# Altium PCB PCB1.PcbDoc (part 1 of 2)
Units mm, origin at the board's own origin, x right, y up, seen from the top; angles counter-clockwise.
Board outline 60 x 60 mm, 2 copper layers (Top Layer, Bottom Layer); 59 components, 49 nets, 265 pads, 0 vias.
Unrouted connection lines stored in the file: 170.
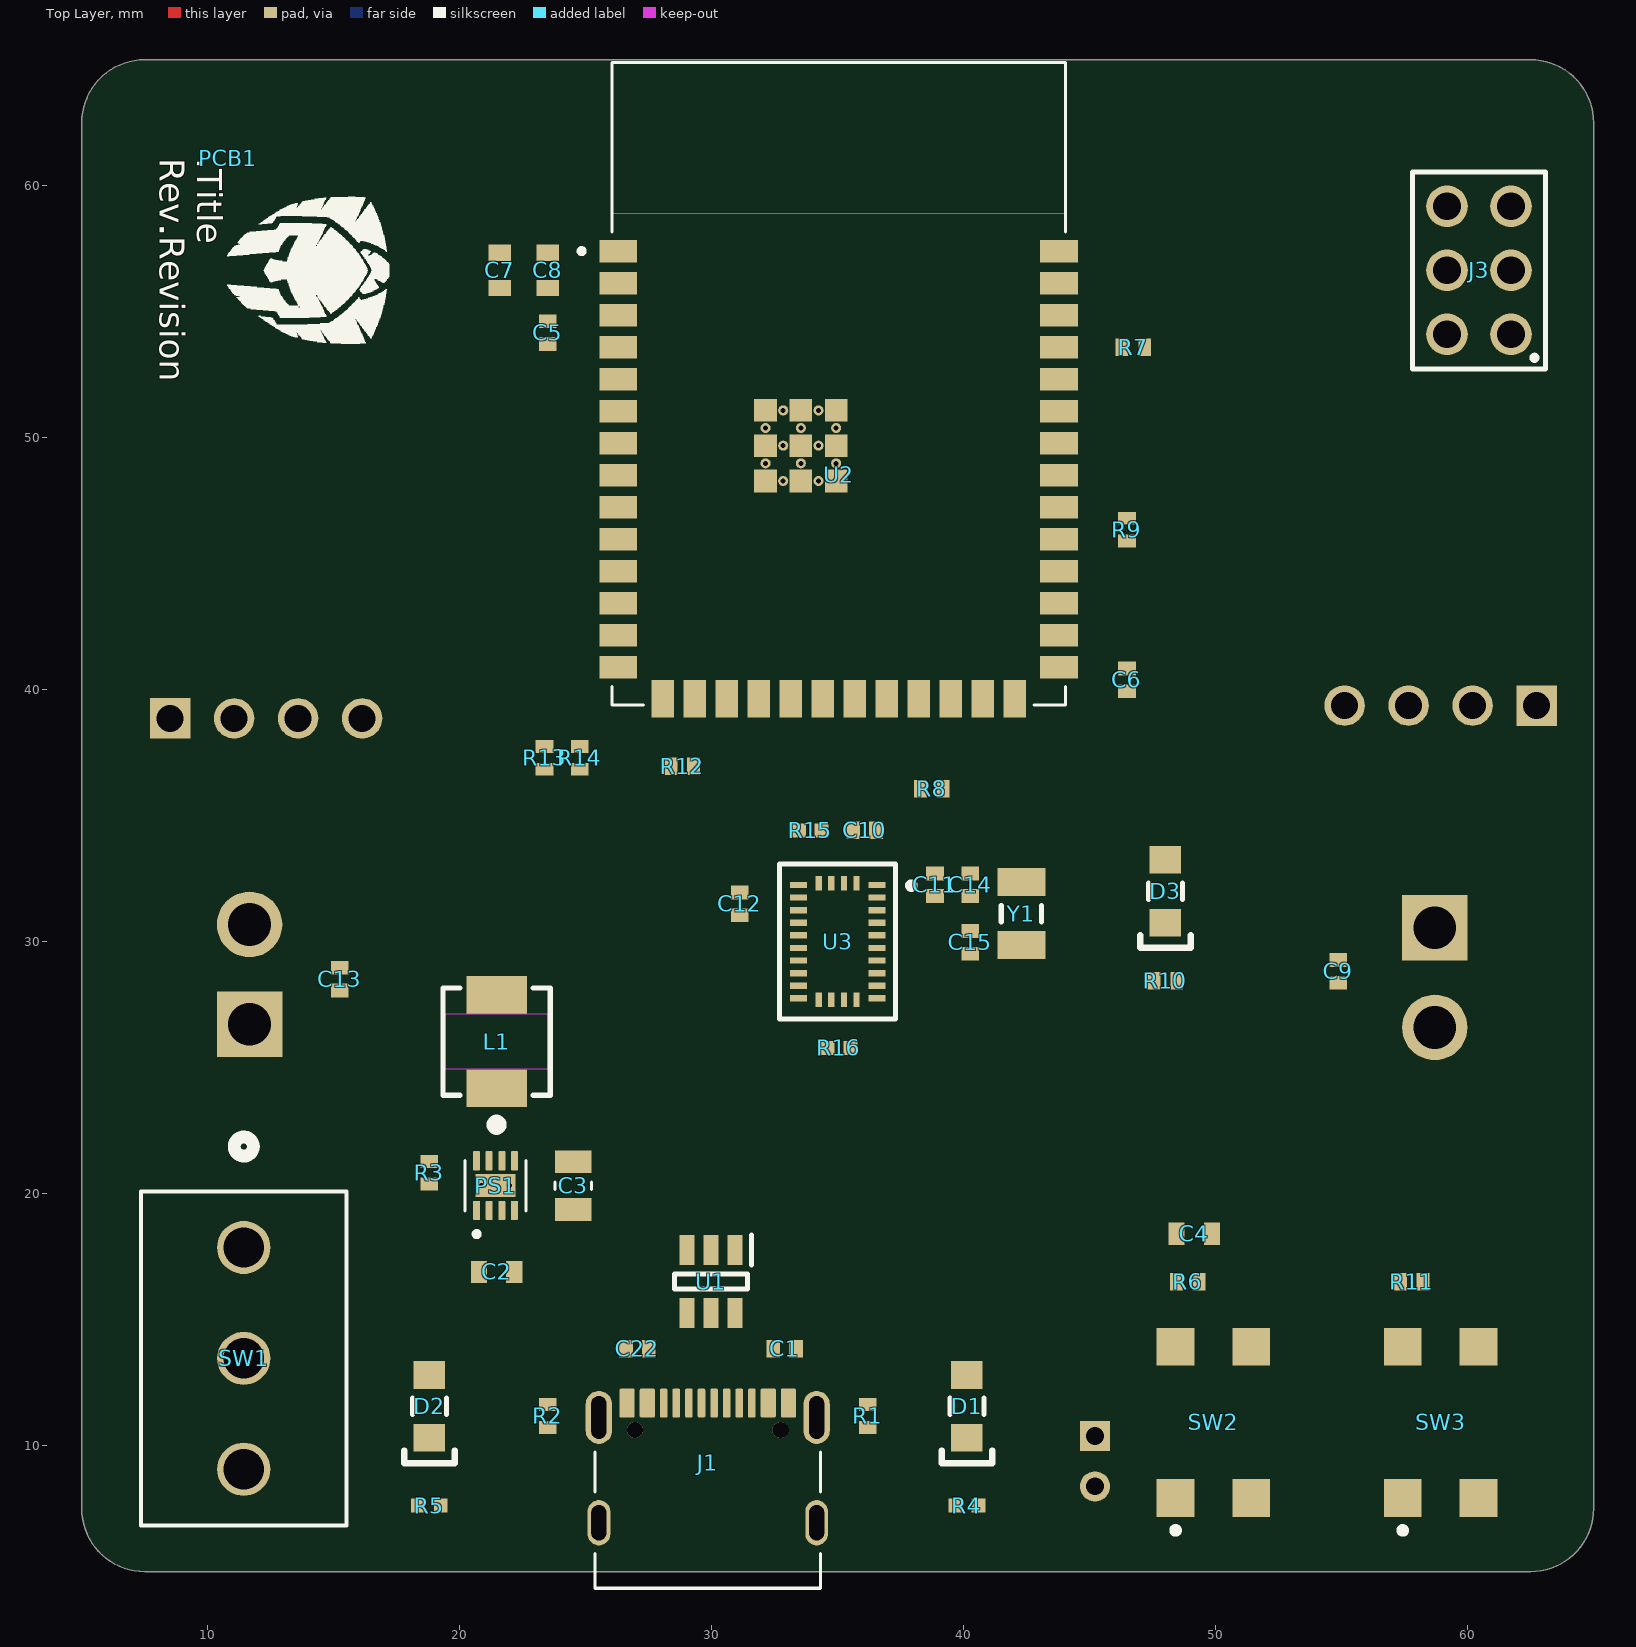
[diagram p0: Top Layer view]
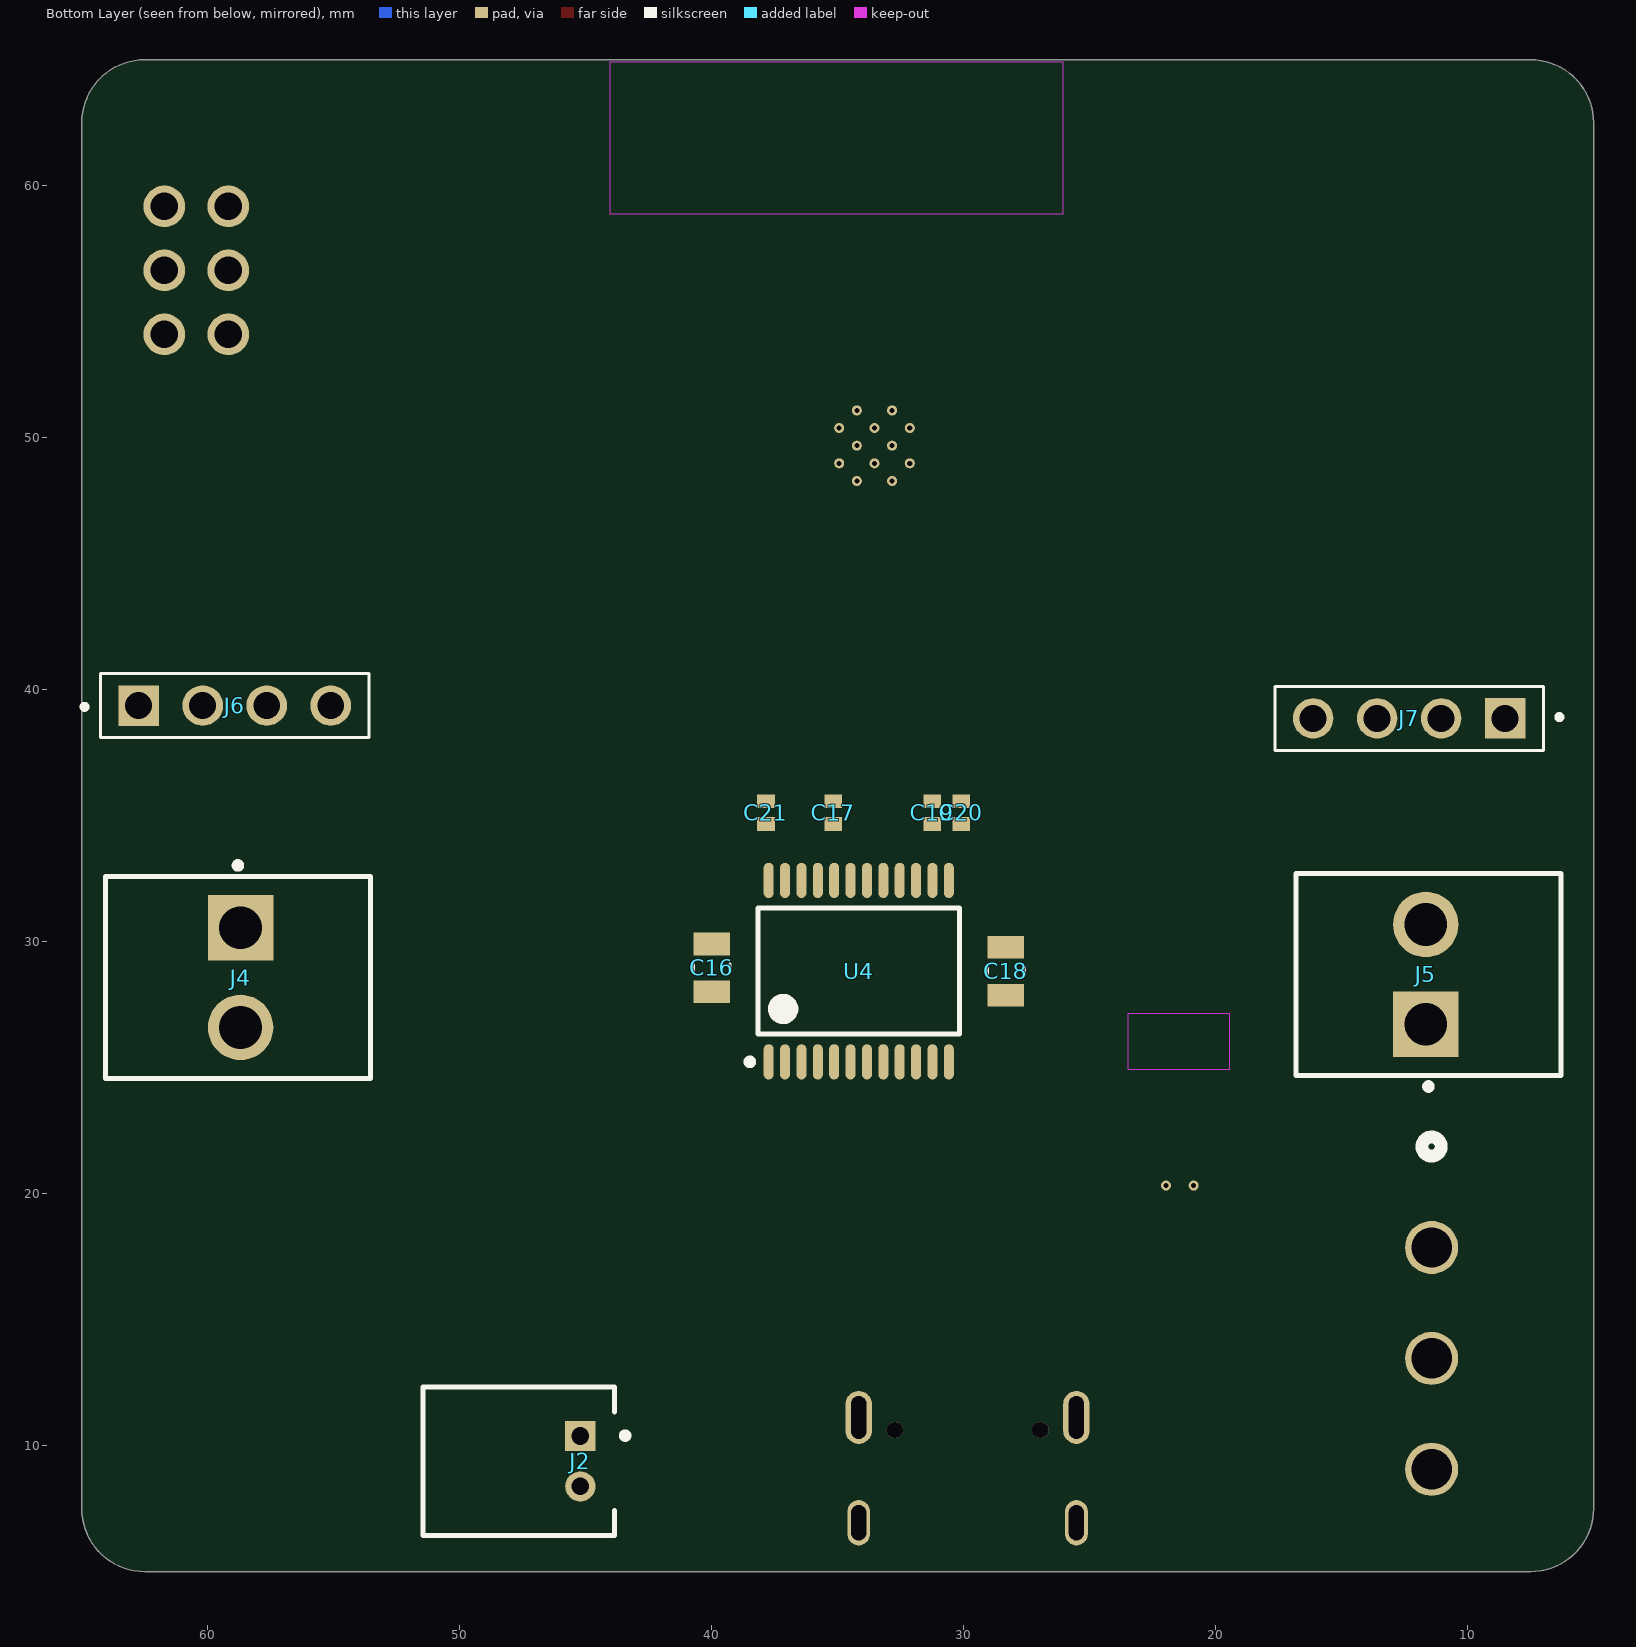
[diagram p1: Bottom Layer view, seen from below]

## Layer stack, top to bottom
Top Solder: solder mask 0.0102, Solder Resist, Dk 3.5
Top Layer: signal copper 0.0356
Dielectric 1: dielectric 0.32, FR-4, Dk 4.8
Bottom Layer: signal copper 0.0356
Bottom Solder: solder mask 0.0102, Solder Resist, Dk 3.5

## Board outline
5,7.5 5,62.5 cw(c7.5,62.5) 7.5,65 62.5,65 cw(c62.5,62.5) 65,62.5 65,7.5 cw(c62.5,7.5) 62.5,5 7.5,5 cw(c7.5,7.5)

## Design rules (kind name [scope] priority, off if disabled: settings)
Clearance [All] p1: gap=0.254 ignorepadtopadclearanceinfootprint=FALSE
DiffPairsRouting [All] p1: maxlimit=0.254 minlimit=0.254 mostfreqgap=0.254 toplayer_minwidth=0.381 toplayer_maxwidth=0.381 toplayer_prefwidth=0.381 bottomlayer_minwidth=0.381 bottomlayer_maxwidth=0.381 bottomlayer_prefwidth=0.381 maxuncoupledlength=12.7
PolygonConnect [All] p1: connectstyle=Relief reliefconductorwidth=0.254 reliefentries=4 polygonreliefangle="90 Angle" airgapwidth=0.254
RoutingVias [All] p1: holewidth=0.711 width=1.27 viastyle="Through Hole" minholewidth=0.711 minwidth=1.27 maxholewidth=0.711 maxwidth=1.27
SolderMaskExpansion [All] p1: expansion=0 istentingtop=FALSE
SupplyNets "Schematic Supply Nets_4" [InNet('VBUS')] p1: voltage=0.000
SupplyNets "Schematic Supply Nets_3" [InNet('VSEL')] p2: voltage=0.000
SupplyNets "Schematic Supply Nets_2" [InNet('+3V3')] p3: voltage=0.000
SupplyNets "Schematic Supply Nets_1" [InNet('VBAT')] p4: voltage=0.000
SupplyNets "Schematic Supply Nets" [InNet('GND')] p5: voltage=0.000
Width [All] p1: maxlimit=0.254 minlimit=0.254 preferedwidth=0.254
29 further rules are at their usual default settings.

## Classes and differential pairs
net class POWER_NET: +3V3 VBAT VBUS VSEL
component class "Power & USB": C1 C2 C3 C22 D1 D2 J1 J2 L1 PS1 R1 R2 R3 R4 R5 SW1 U1
component class Peripherials: C9 C10 C11 C12 C13 C14 C15 C16 C17 C18 C19 C20 C21 J4 J5 J6 J7 R15 R16 U3 U4 Y1
component class "Logic Control": C4 C5 C6 C7 C8 D3 J3 R6 R7 R8 R9 R10 R11 R12 R13 R14 SW2 SW3 U2
component class cover: PCB1
differential pair USB_MCU: +USB_MCU_P -USB_MCU_N
differential pair usb_io: +usb_io_P -usb_io_N
differential pair USB_C: +USB_C_P -USB_C_N

## Components (designator, comment, footprint, x,y, rotation, side; value= is the part's Value field where it differs from the comment)
C1 "CGA2B3X7R1H104K050BB" C0402_H0P7 32.893,13.843 r0 top value=100nF
C2 "GRM188R61E106MA73D" C0603_H0P8 21.463,16.891 r0 top value=10uF
C3 "GRM21BR61E226ME44K" C0805_H1P45 24.511,20.32 r270 top value=22uF
C4 "CL10B105KO8NNNC" C0603_H0P8 49.149,18.415 r0 top value=1uF
C5 "GRM155R71E104KE14J" C0402_H0P7 23.495,54.171 r270 top value=100nF
C6 "GRM155R71E104KE14J" C0402_H0P7 46.482,40.386 r270 top value=100nF
C7 "CL10B105KO8NNNC" C0603_H0P8 21.59,56.642 r90 top value=1uF
C8 "GRM188R61E106MA73D" C0603_H0P8 23.495,56.642 r90 top value=10uF
C9 "CGA2B3X7R1H104K050BB" C0402_H0P7 54.864,28.82 r270 top value=100nF
C10 "GRM155R71C104JA88D" C0402_H0P7 36.068,34.417 r0 top value=100nF
C11 "GRM155R71C104JA88D" C0402_H0P7 38.862,32.258 r90 top value=100nF
C12 "GRM155R71C104JA88D" C0402_H0P7 31.115,31.496 r90 top value=100nF
C13 "CGA2B3X7R1H104K050BB" C0402_H0P7 15.24,28.517 r90 top value=100nF
C14 "CC0402JRNPO9BN220" C0402_H0P7 40.259,32.258 r90 top value=22pF
C15 "CC0402JRNPO9BN220" C0402_H0P7 40.259,29.972 r270 top value=22pF
C16 "GRM21BR61E106KA73K" C0805_H1P45 40.005,28.956 r270 bottom value=10uF
C17 "GRM155R71E104KE14J" C0402_H0P7 35.179,35.121 r90 bottom value=100nF
C18 "GRM21BR61E106KA73K" C0805_H1P45 28.321,28.829 r270 bottom value=10uF
C19 "GRM155R71E104KE14J" C0402_H0P7 31.242,35.121 r90 bottom value=100nF
C20 "GRM155R71E104KE14J" C0402_H0P7 30.099,35.121 r90 bottom value=100nF
C21 "GRM155R71E104KE14J" C0402_H0P7 37.846,35.121 r90 bottom value=100nF
C22 "CGA2B3X7R1H104K050BB" C0402_H0P7 27.051,13.843 r180 top value=100nF
D1 "LTST-C171KRKT" LTST-C171KXKT 40.132,11.557 r90 top
D2 "LTST-C171KGKT" LTST-C171KGKT 18.796,11.557 r90 top
D3 "LTST-C171KBKT" LTST-C171KXKT 48.006,32.004 r90 top
J1 "12402012E212A" AMPHENOL_12402012E212A 29.845,6.939 r0 top
J2 "S2B-PH-K-S" JST-S2B-PH-K-S_V 47.662,9.382 r270 bottom value=10µF
J3 "61300621121" 61300621121 60.452,56.642 r90 top
J4 "26-60-4020" FP-26-60-4020-MFG 58.801,28.575 r270 bottom
J5 "26-60-4020" FP-26-60-4020-MFG 11.557,28.702 r90 bottom
J6 "PPTC041LFBN-RC" SULLINS_PPTC041LFBN-RC 58.928,39.37 r180 bottom
J7 "PPTC041LFBN-RC" SULLINS_PPTC041LFBN-RC 12.319,38.862 r0 bottom
L1 "I2u2H" WE-LHMI_4020 21.463,26.035 r90 top
PCB1 "'" PCB_Logo 10.795,61.087 r270 top
PS1 "TPS62162DSGR" SON50P200X200X80-9N 21.421,20.32 r90 top
R1 "5K1" R0402_H0P4 36.195,11.176 r270 top
R2 "5K1" R0402_H0P4 23.495,11.176 r270 top
R3 "RC0402FR-07100KL" R0402_H0P4 18.796,20.828 r90 top value=100K
R4 "RC0402FR-0710KL" RES0402-M 40.132,7.62 r0 top value=10K
R5 "RC0402FR-0710KL" RES0402-M 18.796,7.62 r0 top value=10K
R6 "RC0402FR-0710KL" R0402_H0P4 48.895,16.51 r0 top value=10K
R7 "470R" R0402_H0P4 46.736,53.594 r180 top
R8 "RC0402FR-072K2P" R0402_H0P4 38.735,36.068 r0 top value=2K2
R9 "RC0402FR-072K2P" R0402_H0P4 46.482,46.355 r90 top value=2K2
R10 "RC0402FR-0710KL" R0402_H0P4 48.006,28.448 r0 top value=10K
R11 "RC0402FR-7D47KL" R0402_H0P4 57.785,16.51 r0 top value=47K
R12 "RC0402FR-7D47KL" R0402_H0P4 28.829,36.957 r180 top value=47K
R13 "RC0402JR-0733RL" R0402_H0P4 23.368,37.292 r90 top value=33R
R14 "RC0402JR-0733RL" R0402_H0P4 24.765,37.292 r90 top value=33R
R15 "RC0402FR-0710KL" RES0402-M 33.909,34.417 r0 top value=10K
R16 "RC0402FR-0710KL" RES0402-M 35.052,25.781 r0 top value=10K
SW1 "8SS1012-Z" 8SS1012-Z_NDC 11.43,17.862 r270 top
SW2 "TS110916045" TS110916045 49.911,10.922 r90 top
SW3 "TS110916045" TS110916045 58.928,10.922 r90 top
U1 "USBLC6-2SC6" SOT95P280X145-6N 29.972,16.51 r270 top
U2 "ESP32-S3-WROOM-1-N4" XCVR_ESP32-S3-WROOM-1-N4 35.039,52.144 r0 top
U3 "BNO085" FP-BNO085-MFG 35,30 r0 top
U4 "TB6612FNG" TOSH-SSOP-24_N 34.163,28.829 r90 bottom
Y1 "ABS07-32.768KHZ-T" FP-ABS07-MFG 42.291,31.115 r270 top value=12.5pF

## Footprints (in the part's own frame and the unit in brackets; to place one, negate y for a bottom-side part, rotate by r counter-clockwise, add the part's x,y. Pads: shape width x height; smd on the part's side, far side on the other; paste and mask are expansions set on the pad)
8SS1012-Z_NDC [mil]
  round 83 / inner round 60 / far side round 83 hole 63 paste-99999 mask+0: 1(0,0) 2(173.23,0) 3(346.46,0)
  silkscreen extent -173,-161 434,161, body extent -83,-156 429,156, height 610
61300621121 [mm]
  round 1.65 hole 1.1: 1(-2.54,-1.27) 2(-2.54,1.27) 3(0,-1.27) 4(0,1.27) 5(2.54,-1.27) 6(2.54,1.27)
  silkscreen extent -3.91,-2.64 3.91,2.64, body extent -3.81,-2.54 3.81,2.54, height 8.57
AMPHENOL_12402012E212A [mm]
  rrect16% 0.6x1.14 smd mask+0.05: A1_B12(-3.2,4.75) A4_B9(-2.4,4.75) B1_A12(3.2,4.75) B4_A9(2.4,4.75)
  rrect33% 0.3x1.14 smd mask+0.05: A5(-1.25,4.75) A6(-0.25,4.75) A7(0.25,4.75) A8(1.25,4.75) B5(1.75,4.75) B6(0.75,4.75) B7(-0.75,4.75) B8(-1.75,4.75)
  oval 1.05x2.1 hole 0.6 slot 1.7 at 90 deg: SH1(-4.32,4.18) SH2(4.32,4.18)
  oval 0.9x1.8 hole 0.6 slot 1.4 at 90 deg: SH3(-4.32,0) SH4(4.32,0)
  round 0.65 hole 0.65 unplated mask+0: ""(-2.89,3.68) ""(2.89,3.68)
  silkscreen extent -4.47,-2.6 4.47,2.81, body extent -4.47,-2.59 4.47,5.01, height 3.27
C0402_H0P7 [mm]
  rect 0.55x0.7 smd mask+0.05: 1(-0.45,0) 2(0.45,0)
  body extent -0.53,-0.28 0.53,0.28, height 0.55
C0603_H0P8 [mm]
  rect 0.64x0.89 smd mask+0.05: 1(-0.7,0) 2(0.7,0)
  body extent -0.9,-0.5 0.9,0.5, height 1
C0805_H1P45 [mm]
  rect 0.9x1.45 smd mask+0.05: 1(-0.95,0) 2(0.95,0)
  silkscreen extent -0.15,-0.72 0.15,0.72, body extent -1.1,-0.72 1.1,0.72, height 1.45
FP-26-60-4020-MFG [mm]
  rect 2.6x2.6 hole 1.7 paste-2539.97 mask+0: 1(-1.98,0.105)
  round 2.6 hole 1.7 paste-2539.97 mask+0: 2(1.98,0.105)
  silkscreen extent -4.57,-5.26 4.01,5.26, body extent -3.89,-4.81 3.89,5.2, height 15.37
FP-ABS07-MFG [mm]
  rect 1.1x1.9 smd paste+0 mask+0: 1(-1.25,0) 2(1.25,0)
  silkscreen extent -0.33,-0.8 0.33,0.8, body extent -1.9,-1.05 1.9,1.05, height 0.25
FP-BNO085-MFG [mm]
  rect 0.675x0.25 smd paste+0 mask+0: 1(1.562,2.25) 6(-1.562,2.25) 7(-1.562,1.75) 8(-1.562,1.25) 9(-1.562,0.75) 10(-1.562,0.25) 11(-1.562,-0.25) 12(-1.562,-0.75) 13(-1.562,-1.25) 14(-1.562,-1.75) 15(-1.562,-2.25) 20(1.562,-2.25) 21(1.562,-1.75) 22(1.562,-1.25) 23(1.562,-0.75) 24(1.562,-0.25) 25(1.562,0.25) 26(1.562,0.75) 27(1.562,1.25) 28(1.562,1.75)
  rect 0.25x0.575 smd paste+0 mask+0: 2(0.75,2.312) 3(0.25,2.312) 4(-0.25,2.312) 5(-0.75,2.312) 16(-0.75,-2.312) 17(-0.25,-2.312) 18(0.25,-2.312) 19(0.75,-2.312)
  silkscreen extent -2.3,-3.08 3.05,3.08, body extent -2.45,-3.15 2.45,3.15, height 0.25
JST-S2B-PH-K-S_V [mm] "THD, 2-Leads, Body 7.6x5.9mm, Pitch 2mm"
  rect 1.2x1.2 hole 0.7: 1(-1,2.45)
  round 1.2 hole 0.7: 2(1,2.45)
  silkscreen extent -2.95,-3.8 2.95,4.35, body extent -2.95,-3.8 2.95,3.8, height 4.8
LTST-C171KGKT [mm]
  rect 1.1x1.25 smd paste+0 mask+0.05: 1(-1.25,0) 2(1.25,0)
  silkscreen extent -2.25,-1 0.33,1, body extent -1.9,-0.77 1.9,0.77, height 0.25
LTST-C171KXKT [mm]
  rect 1.1x1.25 smd paste+0 mask+0.05: 1(-1.25,0) 2(1.25,0)
  silkscreen extent -2.25,-1 0.33,1, body extent -1,-0.63 1,0.63, height 0.8
PCB_Logo [mm] "Logo"
  silkscreen extent 1.52,-0.03 7.36,6.41
R0402_H0P4 [mm]
  rect 0.51x0.7 smd mask+0.05: 1(-0.45,0) 2(0.45,0)
  body extent -0.52,-0.3 0.52,0.3, height 0.34
RES0402-M [mm] "Chip Resistor, 2-Leads, Body 1.00x0.50mm, IPC Medium Density"
  rect 0.55x0.55 smd mask+0.051: 1(-0.45,0) 2(0.45,0)
  body extent -0.53,-0.28 0.53,0.28, height 0.35
SON50P200X200X80-9N [mm]
  rrect25% 0.76x0.28 smd: 1(-0.985,0.75) 2(-0.985,0.25) 3(-0.985,-0.25) 4(-0.985,-0.75) 5(0.985,-0.75) 6(0.985,-0.25) 7(0.985,0.25) 8(0.985,0.75)
  rect 0.9x1.6 smd paste-2: 9(0,0)
  round 0.4 hole 0.2 mask+0: 10(0,0.55) 11(0,-0.55)
  silkscreen extent -2.02,-1.21 1,1.21, body extent -1,-1 1,1, height 0.75
SOT95P280X145-6N [mm]
  rect 1.2x0.6 smd: 1(-1.25,0.95) 2(-1.25,0) 3(-1.25,-0.95) 4(1.25,-0.95) 5(1.25,0) 6(1.25,0.95)
  silkscreen extent -1.85,-1.45 0.3,1.6, body extent -1.4,-1.45 1.4,1.45, height 1.2
SULLINS_PPTC041LFBN-RC [mm]
  rect 1.605x1.605 / inner round 1.605 / far side rect 1.605x1.605 hole 1.07: 1(-3.81,0)
  round 1.605 hole 1.07: 2(-1.27,0) 3(1.27,0) 4(3.81,0)
  silkscreen extent -6.06,-1.27 5.33,1.27, body extent -5.33,-1.27 5.33,1.27, height 8.51
TOSH-SSOP-24_N [mm] "SOP, 24-Leads, Body 8x5.8mm, Pitch 0.65mm, IPC Medium Density"
  oval 1.4x0.4 smd: 1(-3.6,3.575) 2(-3.6,2.925) 3(-3.6,2.275) 4(-3.6,1.625) 5(-3.6,0.975) 6(-3.6,0.325) 7(-3.6,-0.325) 8(-3.6,-0.975) 9(-3.6,-1.625) 10(-3.6,-2.275) 11(-3.6,-2.925) 12(-3.6,-3.575) 13(3.6,-3.575) 14(3.6,-2.925) 15(3.6,-2.275) 16(3.6,-1.625) 17(3.6,-0.975) 18(3.6,-0.325) 19(3.6,0.325) 20(3.6,0.975) 21(3.6,1.625) 22(3.6,2.275) 23(3.6,2.925) 24(3.6,3.575)
  silkscreen extent -3.72,-4 2.5,4.45, body extent -3.8,-4 3.8,4, height 1.6
TS110916045 [mm]
  rect 1.5x1.5 smd: 1(-3,1.5) 2(3,1.5) 3(-3,-1.5) 4(3,-1.5)
  silkscreen extent -4.39,1.4 -4.19,1.6, body extent -3.28,-2.24 3.22,2.26, height 3.8
WE-LHMI_4020 [mm]
  rect 1.5x2.4 smd: 1(-1.85,0) 2(1.85,0)
  Keep-Out Layer region: 1.1,-2.03 -1.1,-2.03 -1.1,2.03 1.1,2.03
  silkscreen extent -3.5,-2.13 2.13,2.13, body extent -2.22,-2.03 2.22,2.03, height 1.8
XCVR_ESP32-S3-WROOM-1-N4 [mm]
  rect 1.5x0.9 smd: 1(-8.75,5.26) 2(-8.75,3.99) 3(-8.75,2.72) 4(-8.75,1.45) 5(-8.75,0.18) 6(-8.75,-1.09) 7(-8.75,-2.36) 8(-8.75,-3.63) 9(-8.75,-4.9) 10(-8.75,-6.17) 11(-8.75,-7.44) 12(-8.75,-8.71) 13(-8.75,-9.98) 14(-8.75,-11.25) 27(8.75,-11.25) 28(8.75,-9.98) 29(8.75,-8.71) 30(8.75,-7.44) 31(8.75,-6.17) 32(8.75,-4.9) 33(8.75,-3.63) 34(8.75,-2.36) 35(8.75,-1.09) 36(8.75,0.18) 37(8.75,1.45) 38(8.75,2.72) 39(8.75,3.99) 40(8.75,5.26)
  rect 0.9x1.5 smd: 15(-6.985,-12.5) 16(-5.715,-12.5) 17(-4.445,-12.5) 18(-3.175,-12.5) 19(-1.905,-12.5) 20(-0.635,-12.5) 21(0.635,-12.5) 22(1.905,-12.5) 23(3.175,-12.5) 24(4.445,-12.5) 25(5.715,-12.5) 26(6.985,-12.5)
  rect 0.9x0.9 smd: 41_1(-1.5,-2.46) 41_2(-2.9,-2.46) 41_3(-0.1,-2.46) 41_4(-2.9,-3.86) 41_5(-1.5,-3.86) 41_6(-0.1,-3.86) 41_7(-2.9,-1.06) 41_8(-1.5,-1.06) 41_9(-0.1,-1.06)
  round 0.4 hole 0.2 mask+0: 41_10(-1.5,-1.76) 41_11(-2.9,-1.76) 41_12(-0.1,-1.76) 41_13(-2.9,-3.16) 41_14(-1.5,-3.16) 41_15(-0.1,-3.16) 41_16(-2.2,-1.06) 41_17(-0.8,-1.06) 41_18(-2.2,-2.46) 41_19(-0.8,-2.46) 41_20(-2.2,-3.86) 41_21(-0.8,-3.86)
  Keep-Out Layer region: 9,6.75 -9,6.75 -9,12.75 9,12.75
  Keep-Out Layer region: 9,6.75 -9,6.75 -9,12.75 9,12.75
  silkscreen extent -10.3,-12.75 9,12.75, body extent -8.98,-12.7 9.02,12.8, height 3.25

## Part data
C1 C9 C13 C22: library part "C0.1uF 50V 0402", "C0.1uF 50V X7R 10% 0402", Capacitor Type=Ceramic, Case/Package=0402, Manufacturer=TDK, Max Operating Temperature=125°C, Min Operating Temperature=-55°C, Package Shape=Rectangular, Package Style=SMTMeter, Rated DC Voltage (URdc)=50V, Supplier Part Number=445-6899-1-ND, Temperature Characteristics Code=X7R, Tolerance  (fill in as +-)=10%, Category="Ceramic Capacitors", ComponentLink1Description=https://datasheet.ciiva.com:443/pdfs/VipMasterIC/IC/TDKC/TDKC-S-A0008953915/TDKC-S-A0008953915-1.pdf?src-supplier=IHS+Markit, ComponentLink1URL=https://datasheet.ciiva.com:443/pdfs/VipMasterIC/IC/TDKC/TDKC-S-A0008953915/TDKC-S-A0008953915-1.pdf?src-supplier=IHS+Markit, ComponentLink2Description=https://datasheet.ciiva.com/16498/mlccspec-automotive-general-midvoltage-en-16498528.pdf?src-supplier=Future+Electronics, ComponentLink2URL=https://datasheet.ciiva.com/16498/mlccspec-automotive-general-midvoltage-en-16498528.pdf?src-supplier=Future+Electronics, ComponentLink3Description=https://datasheet.ciiva.com/24216/cga2b3x7r1h104k050bb-266281-24216070.pdf?src-supplier=Mouser, ComponentLink3URL=https://datasheet.ciiva.com/24216/cga2b3x7r1h104k050bb-266281-24216070.pdf?src-supplier=Mouser, ComponentLink4Description=https://datasheet.ciiva.com/22725/1735392-22725627.pdf?src-supplier=Element14, ComponentLink4URL=https://datasheet.ciiva.com/22725/1735392-22725627.pdf?src-supplier=Element14, Dielectric Material=Ceramic, Height=0.5mm, JESD-609 Code=e3, Length=1mm, Manufacturer Part Number=CGA2B3X7R1H104K050BB, Mounting Technology="Surface Mount", Multilayer=Yes, Packaging="Tape and Reel", Pins=2, Pricing="1=0.13, 10=0.075, 100=0.0451, 1000=0.02937, 2500=0.02541, 5000=0.02301 (USD)", Reach SVHC Compliant=Yes, Reference Standard=AEC-Q200, RoHS=Yes, RoHS Compliant=Yes, Stock=2155708, Supplier=Digikey, Supplier 1=DigiKey, Supplier Part Number 1=445-6899-1-ND, Terminal Finish=Nickel, Termination=Wraparound, Tolerance (fill in as +-)=10%, Width=0.5mm
C2 C8: library part "C10uF 25V 0603", "10uF 25V X5R 20% 0603", Manufacturer="Murata Electronics North America", Package=0603, Supplier Part Number 1=490-7202-1-ND, Temp Coef=X5R, Tolerance=20%, Voltage=25V, Datasheet=https://www.murata.com/~/media/webrenewal/support/library/catalog/products/capacitor/mlcc/c02e.ashx?la=en-us, Internal Code=0-ECCAP10uX5RV25%20P0603-, Manufacturer Part Number=GRM188R61E106MA73D, Packaging="Cut Tape", RoHS Compliant=Yes, Supplier 1=DigiKey, Supplier Link 1=https://www.digikey.com/products/en?keywords=490-7202-1-ND, Type=Capacitor
C3: library part "C22uF 25V 0805", "22uF 25V X5R 20% 0805", Capacitor Type=Ceramic, Case/Package=0805, Manufacturer=Murata, Max Operating Temperature=85°C, Min Operating Temperature=-55°C, Package Shape=Rectangular, Package Style=SMTMeter, Rated DC Voltage (URdc)=25V, Supplier Part Number=81-GRM21BR61E226ME4K, Temperature Characteristics Code=X5R, Tolerance  (fill in as +-)=20%, Category="Ceramic Capacitors", ComponentLink1Description=https://datasheet.ciiva.com:443/pdfs/VipMasterIC/IC/MURE/MURE-S-A0002977178/MURE-S-A0002978778-1.pdf?src-supplier=IHS+Markit, ComponentLink1URL=https://datasheet.ciiva.com:443/pdfs/VipMasterIC/IC/MURE/MURE-S-A0002977178/MURE-S-A0002978778-1.pdf?src-supplier=IHS+Markit, ComponentLink2Description=http://www.mouser.com/ds/2/281/c02e-2905.pdf?src-supplier=Mouser, ComponentLink2URL=http://www.mouser.com/ds/2/281/c02e-2905.pdf?src-supplier=Mouser, ComponentLink3Description=https://datasheet.octopart.com/GRM21BR61E226ME44K-Murata-datasheet-155345081.pdf?src-supplier=Element14, ComponentLink3URL=https://datasheet.octopart.com/GRM21BR61E226ME44K-Murata-datasheet-155345081.pdf?src-supplier=Element14, ComponentLink4Description=http://search.murata.co.jp/Ceramy/image/img/A01X/G101/ENG/GRM21BR61E226ME44-01.pdf?src-supplier=Digikey, ComponentLink4URL=http://search.murata.co.jp/Ceramy/image/img/A01X/G101/ENG/GRM21BR61E226ME44-01.pdf?src-supplier=Digikey, ComponentLink5Description=https://search.murata.co.jp/Ceramy/image/img/A01X/G101/ENG/GRM21BR61E226ME44-01.pdf?src-supplier=Digikey, ComponentLink5URL=https://search.murata.co.jp/Ceramy/image/img/A01X/G101/ENG/GRM21BR61E226ME44-01.pdf?src-supplier=Digikey, ComponentLink6Description=https://datasheet.octopart.com/GRM21BR61E226ME44K-Murata-datasheet-99353850.pdf?src-supplier=Future+Electronics, ComponentLink6URL=https://datasheet.octopart.com/GRM21BR61E226ME44K-Murata-datasheet-99353850.pdf?src-supplier=Future+Electronics, ComponentLink7Description=https://datasheet.octopart.com/GRM21BR61E226ME44K-Murata-datasheet-155345081.pdf?src-supplier=Newark, ComponentLink7URL=https://datasheet.octopart.com/GRM21BR61E226ME44K-Murata-datasheet-155345081.pdf?src-supplier=Newark, ComponentLink8Description=https://datasheet.octopart.com/GRM21BR61E226ME44K-Murata-datasheet-165579666.pdf?src-supplier=TME, ComponentLink8URL=https://datasheet.octopart.com/GRM21BR61E226ME44K-Murata-datasheet-165579666.pdf?src-supplier=TME, Dielectric Material=Ceramic, Height=1.25mm, JESD-609 Code=e3, Length=2mm, Manufacturer Part Number=GRM21BR61E226ME44K, Mounting Technology="Surface Mount", Multilayer=Yes, Packaging="Tape and Reel", Pins=2, Pricing="1=0.32, 10=0.198, 50=0.198, 100=0.129, 1000=0.092, 10000=0.069 (USD)", Reach SVHC Compliant=Yes, RoHS=Yes, RoHS Compliant=Yes, Stock=19596, Supplier=Mouser, Terminal Finish=Nickel, Termination=Wraparound, Tolerance (fill in as +-)=20%, Width=1.25mm
C4 C7: library part "C1uF 16V 0603", "1uF 16V X7R 10%", Capacitor Type=Ceramic, Case/Package=0603, Manufacturer=Samsung, Max Operating Temperature=125°C, Min Operating Temperature=-55°C, Package Shape=Rectangular, Rated DC Voltage (URdc)=16V, Temperature Characteristics Code=X7R, Tolerance  (fill in as +-)=10%, Category="Ceramic Capacitors", ComponentLink1Description=https://datasheet.ciiva.com:443/pdfs/VipMasterIC/IC/SEMS/SEMS-S-A0008529196/SEMS-S-A0008529196-1.pdf?src-supplier=IHS+Markit, ComponentLink1URL=https://datasheet.ciiva.com:443/pdfs/VipMasterIC/IC/SEMS/SEMS-S-A0008529196/SEMS-S-A0008529196-1.pdf?src-supplier=IHS+Markit, ComponentLink2Description=https://datasheet.ciiva.com/15195/getdatasheetpartid-357418-15195728.pdf?src-supplier=Verical, ComponentLink2URL=https://datasheet.ciiva.com/15195/getdatasheetpartid-357418-15195728.pdf?src-supplier=Verical, ComponentLink3Description=https://datasheet.ciiva.com/29198/458176-da-01-en-vs-kondensator-0603-29198478.pdf?src-supplier=Conrad, ComponentLink3URL=https://datasheet.ciiva.com/29198/458176-da-01-en-vs-kondensator-0603-29198478.pdf?src-supplier=Conrad, Dielectric Material=Ceramic, JESD-609 Code=e3, Manufacturer Part Number=CL10B105KO8NNNC, Mounting Technology="Surface Mount", Multilayer=Yes, Packaging="Tape and Reel", Pins=2, Pricing="4000=0.00408, 8000=0.00401, 16000=0.00394, 24000=0.00388, 32000=0.00381 (USD)", Reach SVHC Compliant=Yes, RoHS=Yes, RoHS Compliant=Yes, Stock=3952000, Supplier=Avnet, Supplier Part Number=CL10B105KO8NNNC, Terminal Finish=Nickel, Termination=Wraparound, Tolerance (fill in as +-)=10%
C5 C6 C17 C19 C20 C21: library part "C100nF 25V 0402", "100nF 25V X7R 10% 0402", Manufacturer="Murata Electronics", Package="0402 (1005 Metric)", Supplier Part Number 1=490-14603-1-ND, Temp Coef=X7R, Tolerance=10%, Voltage=25V, Datasheet=https://search.murata.co.jp/Ceramy/image/img/A01X/G101/ENG/GRM155R71E104KE14-01.pdf, Manufacturer Part Number=GRM155R71E104KE14J, RoHS Compliant=Yes, Supplier 1=Digikey, Supplier Link 1=https://www.digikey.fr/product-detail/en/murata-electronics/GRM155R71E104KE14J/490-14603-1-ND/6606209, Type=Capacitor
C10 C11 C12: library part "C100nF 16V 0402", "16V 100nF X7R ±5% 0402 Multilayer Ceramic Capacitors MLCC - SMD/SMT ROHS", Case Code (Imperial)=0402, Case Code (Metric)=1005, Dielectric=X7R, Dielectric Material=Ceramic, Manufacturer=Murata, Manufacturer Lifecycle Status=NRND, Max Operating Temperature=125°C, Min Operating Temperature=-55°C, Tolerance=5%, Voltage=16V, Case/Package=0402, Category="Ceramic Capacitors", ComponentLink1Description=https://datasheet.octopart.com/GRM155R71C104JA88D-Murata-datasheet-8819587.pdf, ComponentLink1URL=https://datasheet.octopart.com/GRM155R71C104JA88D-Murata-datasheet-8819587.pdf, ComponentLink2Description=https://datasheet.octopart.com/GRM155R71C104JA88D-Murata-datasheet-12515295.pdf, ComponentLink2URL=https://datasheet.octopart.com/GRM155R71C104JA88D-Murata-datasheet-12515295.pdf, ComponentLink3Description=https://datasheet.octopart.com/GRM155R71C104JA88D-Murata-datasheet-12510076.pdf, ComponentLink3URL=https://datasheet.octopart.com/GRM155R71C104JA88D-Murata-datasheet-12510076.pdf, ComponentLink4Description=https://datasheet.octopart.com/GRM155R71C104JA88D-Murata-datasheet-11978611.pdf, ComponentLink4URL=https://datasheet.octopart.com/GRM155R71C104JA88D-Murata-datasheet-11978611.pdf, ComponentLink5Description=https://datasheet.octopart.com/GRM155R71C104JA88D-Murata-datasheet-10025737.pdf, ComponentLink5URL=https://datasheet.octopart.com/GRM155R71C104JA88D-Murata-datasheet-10025737.pdf, ComponentLink6Description=https://datasheet.octopart.com/GRM155R71C104JA88D-Murata-datasheet-14400566.pdf, ComponentLink6URL=https://datasheet.octopart.com/GRM155R71C104JA88D-Murata-datasheet-14400566.pdf, ComponentLink7Description=https://datasheet.octopart.com:443/GRM155R71C104JA88D-Murata-datasheet-39128483.pdf?src-supplier=Newark, ComponentLink7URL=https://datasheet.octopart.com:443/GRM155R71C104JA88D-Murata-datasheet-39128483.pdf?src-supplier=Newark, ComponentLink8Description=https://datasheet.octopart.com:443/GRM155R71C104JA88D-Murata-datasheet-62317117.pdf?src-supplier=element14+APAC, ComponentLink8URL=https://datasheet.octopart.com:443/GRM155R71C104JA88D-Murata-datasheet-62317117.pdf?src-supplier=element14+APAC, ComponentLink9Description=https://datasheet.octopart.com:443/GRM155R71C104JA88D-Murata-datasheet-165579666.pdf?src-supplier=TME, ComponentLink9URL=https://datasheet.octopart.com:443/GRM155R71C104JA88D-Murata-datasheet-165579666.pdf?src-supplier=TME, ComponentLink10Description=https://datasheet.octopart.com:443/GRM155R71C104JA88D-Murata-datasheet-141266224.pdf?src-supplier=Ciiva, ComponentLink10URL=https://datasheet.octopart.com:443/GRM155R71C104JA88D-Murata-datasheet-141266224.pdf?src-supplier=Ciiva, ComponentLink11Description=https://datasheet.octopart.com:443/GRM155R71C104JA88D-Murata-datasheet-140690971.pdf?src-supplier=Ciiva, ComponentLink11URL=https://datasheet.octopart.com:443/GRM155R71C104JA88D-Murata-datasheet-140690971.pdf?src-supplier=Ciiva, ComponentLink12Description=https://datasheet.octopart.com:443/GRM155R71C104JA88D-Murata-datasheet-138740889.pdf?src-supplier=Ciiva, ComponentLink12URL=https://datasheet.octopart.com:443/GRM155R71C104JA88D-Murata-datasheet-138740889.pdf?src-supplier=Ciiva, ComponentLink13Description=https://datasheet.octopart.com:443/GRM155R71C104JA88D-Murata-datasheet-22122223.pdf?src-supplier=Future+Electronics, ComponentLink13URL=https://datasheet.octopart.com:443/GRM155R71C104JA88D-Murata-datasheet-22122223.pdf?src-supplier=Future+Electronics, ComponentLink14Description=https://datasheet.octopart.com:443/GRM155R71C104JA88D-Murata-datasheet-8324214.pdf?src-supplier=Future+Electronics, ComponentLink14URL=https://datasheet.octopart.com:443/GRM155R71C104JA88D-Murata-datasheet-8324214.pdf?src-supplier=Future+Electronics, ComponentLink15Description=http://sigma.octopart.com:80/reach_statement/Murata-company-16.pdf?src-supplier=Compliance+Statements, ComponentLink15URL=http://sigma.octopart.com:80/reach_statement/Murata-company-16.pdf?src-supplier=Compliance+Statements, Country of Origin=Philippines, Depth=500µm, Export Control Classification Number (ECCN) Code=EAR99, Harmonized Tariff Schedule (HTS) Code=8532.24.00.20, Height=500µm, Introduction Date=2013-11-20, Lead Free="Lead Free", Length=1mm, Lifecycle Status=NRND, Manufacturer Part Number=GRM155R71C104JA88D, Material=Ceramic, Mounting Technology="Surface Mount", Number of Terminals=2, Packaging="Cut Tape", Pricing="10000=0,00481, 20000=0,00468, 40000=0,00463, 80000=0,00451, 160000=0,00441 (USD)", Radiation Hardening=No, REACH SVHC=Yes, RoHS=Compliant, Schedule B="8532240020, 8532240020|8532240020, 8532240020|8532240020|8532240020, 8532240020|8532240020|8532240020|8532240020", Stock=40000, Supplier=Avnet, Supplier Part Number=GRM155R71C104JA88D, Termination=SMD/SMT, Thickness=500µm, Voltage Rating=16V, Voltage Rating (DC)=16V, Width=500µm
C14 C15: library part "C22pF 50V 0402", "22pF 50V C0G, NP0 5% 0402", Manufacturer=Yageo, Package="0402 (1005 Metric)", Supplier Part Number 1=311-1018-1-ND, Temp Coef="C0G, NP0", Tolerance=5%, Voltage=50V, Manufacturer Part Number=CC0402JRNPO9BN220, Supplier 1=Digikey, Supplier Link 1=https://www.digikey.com/product-detail/en/yageo/CC0402JRNPO9BN220/311-1018-1-ND/302935, Type=Capacitor
C16 C18: library part "C10uF 25V 0805", "Cap, 10Uf, 25V, Mlcc, 0805 Rohs Compliant: Yes", Case/Package=0805, Dielectric=X5R, Dielectric Material=Ceramic, Manufacturer=Murata, Manufacturer Lifecycle Status="IN PRODUCTION", Max Operating Temperature=85°C, Min Operating Temperature=-55°C, Supplier Part Number=490-16824-1-ND, Tolerance=10%, Voltage Rating=25V, Category="Ceramic Capacitors", ComponentLink1Description=https://datasheet.octopart.com:443/GRM21BR61E106KA73K-Murata-datasheet-149523495.pdf?src-supplier=Newark, ComponentLink1URL=https://datasheet.octopart.com:443/GRM21BR61E106KA73K-Murata-datasheet-149523495.pdf?src-supplier=Newark, ComponentLink2Description=https://datasheet.octopart.com:443/GRM21BR61E106KA73K-Murata-datasheet-141278247.pdf?src-supplier=Geoflip, ComponentLink2URL=https://datasheet.octopart.com:443/GRM21BR61E106KA73K-Murata-datasheet-141278247.pdf?src-supplier=Geoflip, ComponentLink3Description=https://datasheet.octopart.com:443/GRM21BR61E106KA73K-Murata-datasheet-165579666.pdf?src-supplier=TME, ComponentLink3URL=https://datasheet.octopart.com:443/GRM21BR61E106KA73K-Murata-datasheet-165579666.pdf?src-supplier=TME, ComponentLink4Description=https://datasheet.octopart.com:443/GRM21BR61E106KA73K-Murata-datasheet-140707569.pdf?src-supplier=Ciiva, ComponentLink4URL=https://datasheet.octopart.com:443/GRM21BR61E106KA73K-Murata-datasheet-140707569.pdf?src-supplier=Ciiva, ComponentLink5Description=https://datasheet.octopart.com:443/GRM21BR61E106KA73K-Murata-datasheet-138744870.pdf?src-supplier=Ciiva, ComponentLink5URL=https://datasheet.octopart.com:443/GRM21BR61E106KA73K-Murata-datasheet-138744870.pdf?src-supplier=Ciiva, ComponentLink6Description=https://datasheet.octopart.com:443/GRM21BR61E106KA73K-Murata-datasheet-99353849.pdf?src-supplier=Future+Electronics, ComponentLink6URL=https://datasheet.octopart.com:443/GRM21BR61E106KA73K-Murata-datasheet-99353849.pdf?src-supplier=Future+Electronics, ComponentLink7Description=https://datasheet.octopart.com/GRM21BR61E106KA73K-Murata-datasheet-12515295.pdf, ComponentLink7URL=https://datasheet.octopart.com/GRM21BR61E106KA73K-Murata-datasheet-12515295.pdf, ComponentLink8Description=https://datasheet.octopart.com/GRM21BR61E106KA73K-Murata-datasheet-12510076.pdf, ComponentLink8URL=https://datasheet.octopart.com/GRM21BR61E106KA73K-Murata-datasheet-12510076.pdf, ComponentLink9Description=https://datasheet.octopart.com/GRM21BR61E106KA73K-Murata-datasheet-11978611.pdf, ComponentLink9URL=https://datasheet.octopart.com/GRM21BR61E106KA73K-Murata-datasheet-11978611.pdf, ComponentLink10Description=https://datasheet.octopart.com/GRM21BR61E106KA73K-Murata-datasheet-10025737.pdf, ComponentLink10URL=https://datasheet.octopart.com/GRM21BR61E106KA73K-Murata-datasheet-10025737.pdf, ComponentLink11Description=https://datasheet.octopart.com/GRM21BR61E106KA73K-Murata-datasheet-8819587.pdf, ComponentLink11URL=https://datasheet.octopart.com/GRM21BR61E106KA73K-Murata-datasheet-8819587.pdf, ComponentLink12Description=https://datasheet.octopart.com/GRM21BR61E106KA73K-Murata-datasheet-14397508.pdf, ComponentLink12URL=https://datasheet.octopart.com/GRM21BR61E106KA73K-Murata-datasheet-14397508.pdf, ComponentLink13Description=http://sigma.octopart.com:80/reach_statement/Murata-company-16.pdf?src-supplier=Compliance+Statements, ComponentLink13URL=http://sigma.octopart.com:80/reach_statement/Murata-company-16.pdf?src-supplier=Compliance+Statements, Height=1.25mm, Length=2mm, Lifecycle Status=Production, Manufacturer Part Number=GRM21BR61E106KA73K, Material=Ceramic, Mounting Technology="Surface Mount", Number of Terminals=2, Packaging="Tape & Reel (TR)", Pricing="1=0.16, 10=0.09, 50=0.0632, 100=0.0551, 500=0.04008, 1000=0.03734, 2500=0.03294 (USD)", REACH SVHC=Yes, RoHS=Compliant, Schedule B="8532240020, 8532240020|8532240020, 8532240020|8532240020|8532240020, 8532240020|8532240020|8532240020|8532240020", Stock=102690, Supplier=DigiKey, Thickness=1.25mm, Voltage Rating (DC)=25V, Weight=9.49709mg, Width=1.25mm
D1: "LED RED 0805 wavelength 639nm light intensity 35mcd Front Mounting", Case Code (Imperial)=0805, Case Code (Metric)=2012, Color=RED, Forward Current=30mA, Forward Voltage=2V, Lens Color="Clear, Colorless", Manufacturer=Lite-On, Max Operating Temperature=85°C, Min Operating Temperature=-55°C, Power Dissipation=75mW, Reverse Voltage=5V, Supplier Part Number=160-1427-1-ND, Supplier Part Number 1=160-1426-1-ND, Test Current=20mA, Case/Package=0805, Category=LEDs, China RoHS=Compliant, ComponentLink1Description=https://datasheet.octopart.com:443/LTST-C171KGKT-Lite-On-datasheet-62340967.pdf?src-supplier=ODG+(Origin+Data+Global), ComponentLink1URL=https://datasheet.octopart.com:443/LTST-C171KGKT-Lite-On-datasheet-62340967.pdf?src-supplier=ODG+(Origin+Data+Global), ComponentLink2Description=https://datasheet.octopart.com:443/LTST-C171KGKT-Lite-On-datasheet-180605161.pdf?src-supplier=IHS, ComponentLink2URL=https://datasheet.octopart.com:443/LTST-C171KGKT-Lite-On-datasheet-180605161.pdf?src-supplier=IHS, ComponentLink3Description=https://datasheet.octopart.com:443/LTST-C171KGKT-Lite-On-datasheet-159335.pdf?src-supplier=_legacy+Avnet, ComponentLink3URL=https://datasheet.octopart.com:443/LTST-C171KGKT-Lite-On-datasheet-159335.pdf?src-supplier=_legacy+Avnet, ComponentLink4Description=https://datasheet.octopart.com:443/LTST-C171KGKT-Lite-On-datasheet-166322636.pdf?src-supplier=TME, ComponentLink4URL=https://datasheet.octopart.com:443/LTST-C171KGKT-Lite-On-datasheet-166322636.pdf?src-supplier=TME, ComponentLink5Description=https://datasheet.octopart.com:443/LTST-C171KGKT-Lite-On-datasheet-165573808.pdf?src-supplier=TME, ComponentLink5URL=https://datasheet.octopart.com:443/LTST-C171KGKT-Lite-On-datasheet-165573808.pdf?src-supplier=TME, ComponentLink6Description=https://datasheet.octopart.com:443/LTST-C171KGKT-Lite-On-datasheet-137080783.pdf?src-supplier=X-ON, ComponentLink6URL=https://datasheet.octopart.com:443/LTST-C171KGKT-Lite-On-datasheet-137080783.pdf?src-supplier=X-ON, ComponentLink7Description=https://datasheet.octopart.com:443/LTST-C171KGKT-Lite-On-datasheet-8328465.pdf?src-supplier=Future+Electronics, ComponentLink7URL=https://datasheet.octopart.com:443/LTST-C171KGKT-Lite-On-datasheet-8328465.pdf?src-supplier=Future+Electronics, ComponentLink8Description=https://datasheet.octopart.com:443/LTST-C171KGKT-Lite-On-datasheet-19967.pdf?src-supplier=DigiKey, ComponentLink8URL=https://datasheet.octopart.com:443/LTST-C171KGKT-Lite-On-datasheet-19967.pdf?src-supplier=DigiKey, ComponentLink9Description=https://datasheet.octopart.com:443/LTST-C171KGKT-Lite-On-datasheet-14175002.pdf?src-supplier=iiiC, ComponentLink9URL=https://datasheet.octopart.com:443/LTST-C171KGKT-Lite-On-datasheet-14175002.pdf?src-supplier=iiiC, Depth=1.25mm, Dominant Wavelength=639nm, Height=800µm, Illumination Color=RED, Lead Free="Lead Free", Length=2mm, Lens Style=Clear, Lens Transparency=Clear, Lifecycle Status=Production, Luminous Intensity=35mcd, Manufacturer Part Number=LTST-C171KRKT, Mounting Technology="Surface Mount", Number of Circuits=1, Number of Elements=1, Number of LEDs=1, Number of Terminals=2, Peak Wavelength=639nm, Pins=2, Power Rating=75mW, Pricing="1=0.11, 10=0.077, 100=0.0529, 500=0.04166, 1000=0.03789 (USD)", Radiation Hardening=No, REACH SVHC=Yes, RoHS=Compliant, Schedule B="8541402000, 8541402000|8541402000|8541402000|8541402000|8541402000", Shape=Rectangular, Stock=263738, Supplier=DigiKey, Supplier 1=DigiKey, Supplier 2=DigiKey, Supplier 3=Mouser, Supplier Part Number 2=160-1426-2-ND, Supplier Part Number 3=859-LTST-C171KGKT, Terminal Pitch=2.5mm, Viewing Angle=130°, Wavelength=570nm, Width=1.25mm
D2: "LED yellow green 0805 wavelength 571nm light intensity 35mcd Front Mounting", Case Code (Imperial)=0805, Case Code (Metric)=2012, Color=Green, Forward Current=30mA, Forward Voltage=2V, Lens Color="Clear, Colorless", Manufacturer=Lite-On, Max Operating Temperature=85°C, Min Operating Temperature=-55°C, Power Dissipation=75mW, Reverse Voltage=5V, Supplier Part Number=160-1426-1-ND, Test Current=20mA, Case/Package=0805, Category=LEDs, China RoHS=Compliant, ComponentLink1Description=https://datasheet.octopart.com:443/LTST-C171KGKT-Lite-On-datasheet-62340967.pdf?src-supplier=ODG+(Origin+Data+Global), ComponentLink1URL=https://datasheet.octopart.com:443/LTST-C171KGKT-Lite-On-datasheet-62340967.pdf?src-supplier=ODG+(Origin+Data+Global), ComponentLink2Description=https://datasheet.octopart.com:443/LTST-C171KGKT-Lite-On-datasheet-180605161.pdf?src-supplier=IHS, ComponentLink2URL=https://datasheet.octopart.com:443/LTST-C171KGKT-Lite-On-datasheet-180605161.pdf?src-supplier=IHS, ComponentLink3Description=https://datasheet.octopart.com:443/LTST-C171KGKT-Lite-On-datasheet-159335.pdf?src-supplier=_legacy+Avnet, ComponentLink3URL=https://datasheet.octopart.com:443/LTST-C171KGKT-Lite-On-datasheet-159335.pdf?src-supplier=_legacy+Avnet, ComponentLink4Description=https://datasheet.octopart.com:443/LTST-C171KGKT-Lite-On-datasheet-166322636.pdf?src-supplier=TME, ComponentLink4URL=https://datasheet.octopart.com:443/LTST-C171KGKT-Lite-On-datasheet-166322636.pdf?src-supplier=TME, ComponentLink5Description=https://datasheet.octopart.com:443/LTST-C171KGKT-Lite-On-datasheet-165573808.pdf?src-supplier=TME, ComponentLink5URL=https://datasheet.octopart.com:443/LTST-C171KGKT-Lite-On-datasheet-165573808.pdf?src-supplier=TME, ComponentLink6Description=https://datasheet.octopart.com:443/LTST-C171KGKT-Lite-On-datasheet-137080783.pdf?src-supplier=X-ON, ComponentLink6URL=https://datasheet.octopart.com:443/LTST-C171KGKT-Lite-On-datasheet-137080783.pdf?src-supplier=X-ON, ComponentLink7Description=https://datasheet.octopart.com:443/LTST-C171KGKT-Lite-On-datasheet-8328465.pdf?src-supplier=Future+Electronics, ComponentLink7URL=https://datasheet.octopart.com:443/LTST-C171KGKT-Lite-On-datasheet-8328465.pdf?src-supplier=Future+Electronics, ComponentLink8Description=https://datasheet.octopart.com:443/LTST-C171KGKT-Lite-On-datasheet-19967.pdf?src-supplier=DigiKey, ComponentLink8URL=https://datasheet.octopart.com:443/LTST-C171KGKT-Lite-On-datasheet-19967.pdf?src-supplier=DigiKey, ComponentLink9Description=https://datasheet.octopart.com:443/LTST-C171KGKT-Lite-On-datasheet-14175002.pdf?src-supplier=iiiC, ComponentLink9URL=https://datasheet.octopart.com:443/LTST-C171KGKT-Lite-On-datasheet-14175002.pdf?src-supplier=iiiC, Depth=1.25mm, Dominant Wavelength=571nm, Height=800µm, Illumination Color=Green, Lead Free="Lead Free", Length=2mm, Lens Style=Clear, Lens Transparency=Clear, Lifecycle Status=Production, Luminous Intensity=35mcd, Manufacturer Part Number=LTST-C171KGKT, Mounting Technology="Surface Mount", Number of Circuits=1, Number of Elements=1, Number of LEDs=1, Number of Terminals=2, Peak Wavelength=574nm, Pins=2, Power Rating=75mW, Pricing="1=0.11, 10=0.077, 100=0.0529, 500=0.04166, 1000=0.03789 (USD)", Radiation Hardening=No, REACH SVHC=Yes, RoHS=Compliant, Schedule B="8541402000, 8541402000|8541402000|8541402000|8541402000|8541402000", Shape=Rectangular, Stock=263738, Supplier=DigiKey, Supplier 1=DigiKey, Supplier 2=DigiKey, Supplier 3=Mouser, Supplier Part Number 1=160-1426-1-ND, Supplier Part Number 2=160-1426-2-ND, Supplier Part Number 3=859-LTST-C171KGKT, Terminal Pitch=2.5mm, Viewing Angle=130°, Wavelength=570nm, Width=1.25mm
D3: "LED BLUE 0805 wavelength 470nm light intensity 35mcd Front Mounting", Case Code (Imperial)=0805, Case Code (Metric)=2012, Color=RED, Forward Current=30mA, Forward Voltage=2V, Illumination Color=BLUE, Lens Color="Clear, Colorless", Manufacturer=Lite-On, Max Operating Temperature=85°C, Min Operating Temperature=-55°C, Power Dissipation=75mW, Reverse Voltage=5V, Supplier Part Number=160-1645-1-ND, Supplier Part Number 1=160-1426-1-ND, Test Current=20mA, Case/Package=0805, Category=LEDs, China RoHS=Compliant, ComponentLink1Description=https://datasheet.octopart.com:443/LTST-C171KGKT-Lite-On-datasheet-62340967.pdf?src-supplier=ODG+(Origin+Data+Global), ComponentLink1URL=https://datasheet.octopart.com:443/LTST-C171KGKT-Lite-On-datasheet-62340967.pdf?src-supplier=ODG+(Origin+Data+Global), ComponentLink2Description=https://datasheet.octopart.com:443/LTST-C171KGKT-Lite-On-datasheet-180605161.pdf?src-supplier=IHS, ComponentLink2URL=https://datasheet.octopart.com:443/LTST-C171KGKT-Lite-On-datasheet-180605161.pdf?src-supplier=IHS, ComponentLink3Description=https://datasheet.octopart.com:443/LTST-C171KGKT-Lite-On-datasheet-159335.pdf?src-supplier=_legacy+Avnet, ComponentLink3URL=https://datasheet.octopart.com:443/LTST-C171KGKT-Lite-On-datasheet-159335.pdf?src-supplier=_legacy+Avnet, ComponentLink4Description=https://datasheet.octopart.com:443/LTST-C171KGKT-Lite-On-datasheet-166322636.pdf?src-supplier=TME, ComponentLink4URL=https://datasheet.octopart.com:443/LTST-C171KGKT-Lite-On-datasheet-166322636.pdf?src-supplier=TME, ComponentLink5Description=https://datasheet.octopart.com:443/LTST-C171KGKT-Lite-On-datasheet-165573808.pdf?src-supplier=TME, ComponentLink5URL=https://datasheet.octopart.com:443/LTST-C171KGKT-Lite-On-datasheet-165573808.pdf?src-supplier=TME, ComponentLink6Description=https://datasheet.octopart.com:443/LTST-C171KGKT-Lite-On-datasheet-137080783.pdf?src-supplier=X-ON, ComponentLink6URL=https://datasheet.octopart.com:443/LTST-C171KGKT-Lite-On-datasheet-137080783.pdf?src-supplier=X-ON, ComponentLink7Description=https://datasheet.octopart.com:443/LTST-C171KGKT-Lite-On-datasheet-8328465.pdf?src-supplier=Future+Electronics, ComponentLink7URL=https://datasheet.octopart.com:443/LTST-C171KGKT-Lite-On-datasheet-8328465.pdf?src-supplier=Future+Electronics, ComponentLink8Description=https://datasheet.octopart.com:443/LTST-C171KGKT-Lite-On-datasheet-19967.pdf?src-supplier=DigiKey, ComponentLink8URL=https://datasheet.octopart.com:443/LTST-C171KGKT-Lite-On-datasheet-19967.pdf?src-supplier=DigiKey, ComponentLink9Description=https://datasheet.octopart.com:443/LTST-C171KGKT-Lite-On-datasheet-14175002.pdf?src-supplier=iiiC, ComponentLink9URL=https://datasheet.octopart.com:443/LTST-C171KGKT-Lite-On-datasheet-14175002.pdf?src-supplier=iiiC, Depth=1.25mm, Dominant Wavelength=468nm, Height=800µm, Lead Free="Lead Free", Length=2mm, Lens Style=Clear, Lens Transparency=Clear, Lifecycle Status=Production, Luminous Intensity=35mcd, Manufacturer Part Number=LTST-C171KBKT, Mounting Technology="Surface Mount", Number of Circuits=1, Number of Elements=1, Number of LEDs=1, Number of Terminals=2, Peak Wavelength=468nm, Pins=2, Power Rating=75mW, Pricing="1=0.11, 10=0.077, 100=0.0529, 500=0.04166, 1000=0.03789 (USD)", Radiation Hardening=No, REACH SVHC=Yes, RoHS=Compliant, Schedule B="8541402000, 8541402000|8541402000|8541402000|8541402000|8541402000", Shape=Rectangular, Stock=263738, Supplier=DigiKey, Supplier 1=DigiKey, Supplier 2=DigiKey, Supplier 3=Mouser, Supplier Part Number 2=160-1426-2-ND, Supplier Part Number 3=859-LTST-C171KGKT, Terminal Pitch=2.5mm, Viewing Angle=130°, Wavelength=570nm, Width=1.25mm
J1: library part "USB-C Conn", "USB Connector, USB Type C, USB 2.0, Receptacle, 24 Ways, Surface Mount, Through Hole Mount", Contact Resistance=40mΩ, Current Rating=5A, Insulation Resistance=100MΩ, Manufacturer=Amphenol, Supplier Part Number=664-12402012E212ACT-ND, Category=Connectors, ComponentLink1Description=https://datasheet.octopart.com:443/12402012E212A-Amphenol-Communications-Solutions-datasheet-182242347.pdf?src-supplier=IHS, ComponentLink1URL=https://datasheet.octopart.com:443/12402012E212A-Amphenol-Communications-Solutions-datasheet-182242347.pdf?src-supplier=IHS, Contact Gender=Male, Lifecycle Status=Production, Manufacturer Part Number=12402012E212A, Number of Ports=1, Number of Rows=1, Pins=24, Pricing="1=0.61, 10=0.517, 25=0.4848, 50=0.4616, 100=0.4396, 250=0.41204 (USD)", REACH SVHC=Yes, RoHS=Compliant, Shell Finish=Nickel, Shell Material="Stainless Steel", Stock=15000, Supplier=DigiKey, Supplier 1=DigiKey, Supplier 2=DigiKey, Supplier 3=Mouser, Supplier Part Number 1=664-12402012E212ACT-ND, Supplier Part Number 2=664-12402012E212ATR-ND, Supplier Part Number 3=523-12402012E212A, Terminal Pitch=500µm
J2: "Conn Shrouded Header (4 Sides) HDR 2 POS 2mm Solder RA Side Entry Thru-Hole Box", Case/Package=Radial, Color="Natural, White", Contact Resistance=20mΩ, Current Rating=2A, Flammability Rating="UL94 V-0", Insulation Resistance=1GΩ, Manufacturer=JST, Manufacturer Part Number=S2B-PH-K-S(LF)(SN), Max Operating Temperature=85°C, Max Voltage Rating (AC)=100V, Min Operating Temperature=-25°C, Supplier Part Number=C173752, Tolerance=20%, Voltage Rating=50V, Category="Headers and Wire Housings", China RoHS=Compliant, ComponentLink1Description=https://datasheet.octopart.com:443/S2B-PH-K-S%28LF%29%28SN%29-JST-datasheet-180491669.pdf?src-supplier=IHS, ComponentLink1URL=https://datasheet.octopart.com:443/S2B-PH-K-S%28LF%29%28SN%29-JST-datasheet-180491669.pdf?src-supplier=IHS, ComponentLink2Description=https://datasheet.octopart.com:443/S2B-PH-K-S%28LF%29%28SN%29-JST-datasheet-10411123.pdf?src-supplier=Upverter, ComponentLink2URL=https://datasheet.octopart.com:443/S2B-PH-K-S%28LF%29%28SN%29-JST-datasheet-10411123.pdf?src-supplier=Upverter, ComponentLink3Description=https://datasheet.octopart.com:443/S2B-PH-K-S%28LF%29%28SN%29-JST-datasheet-8324864.pdf?src-supplier=Upverter, ComponentLink3URL=https://datasheet.octopart.com:443/S2B-PH-K-S%28LF%29%28SN%29-JST-datasheet-8324864.pdf?src-supplier=Upverter, ComponentLink4Description=https://datasheet.octopart.com:443/S2B-PH-K-S%28LF%29%28SN%29-JST-datasheet-56537.pdf?src-supplier=Upverter, ComponentLink4URL=https://datasheet.octopart.com:443/S2B-PH-K-S%28LF%29%28SN%29-JST-datasheet-56537.pdf?src-supplier=Upverter, ComponentLink5Description=https://datasheet.octopart.com:443/S2B-PH-K-S%28LF%29%28SN%29-JST-datasheet-15068535.pdf?src-supplier=Upverter, ComponentLink5URL=https://datasheet.octopart.com:443/S2B-PH-K-S%28LF%29%28SN%29-JST-datasheet-15068535.pdf?src-supplier=Upverter, ComponentLink6Description=https://datasheet.octopart.com:443/S2B-PH-K-S%28LF%29%28SN%29-JST-datasheet-147762421.pdf?src-supplier=LKR, ComponentLink6URL=https://datasheet.octopart.com:443/S2B-PH-K-S%28LF%29%28SN%29-JST-datasheet-147762421.pdf?src-supplier=LKR, ComponentLink7Description=https://datasheet.octopart.com:443/S2B-PH-K-S%28LF%29%28SN%29-JST-datasheet-12510261.pdf?src-supplier=Future+Electronics, ComponentLink7URL=https://datasheet.octopart.com:443/S2B-PH-K-S%28LF%29%28SN%29-JST-datasheet-12510261.pdf?src-supplier=Future+Electronics, Connector Type="Male Pin", Contact Gender=Male, Contact Material=Brass, Contact Mating Length=3.302mm, Contact Plating=Tin, Depth=7.6mm, Diameter=5mm, Fastening Type=Detent, Gender=Male, Height=11mm, Lead Free="Lead Free", Lead Pitch=2mm, Length=11mm, Lifecycle Status=Production, Max Current Rating=2A, Max Voltage Rating (DC)=100V, Mounting Technology="Through Hole", Number of Contacts=2, Number of Poles=2, Number of Positions=2, Number of Rows=1, Orientation="Right Angle", Packaging=Bulk, Pins=2, Pitch=2mm, Pricing="20=0.253, 20=0.0301, 20=0.2762, 20=0.0346, 200=0.1981, 200=0.0236, 200=0.2163, 200=0.0271, 1000=0.1674, 1000=0.02, 1000=0.1828, 1000=0.0229, 2000=0.1492, 2000=0.0178, 2000=0.1628, 2000=0.0204, 10000=0.1338, 10000=0.016, 10000=0.1461, 10000=0.0183, 20000=0.125, 20000=0.0149, 20000=0.1365, 20000=0.0171 (CNY)", Radiation Hardening=No, REACH SVHC=Yes, RoHS=Compliant, Stock=45740, Supplier=LCSC, Supplier 1=LCSC, Supplier 2=Mouser, Supplier Part Number 1=C173752, Supplier Part Number 2=306-S2BPHKSLFSNPP, Terminal Pitch=2mm, Termination=Solder, Voltage Rating (AC)=100V, Voltage Rating (DC)=50V, Weight=28.349523g, Width=4.5mm, Working Voltage=100V
J3: library part "CON HEADER 2X3P", "Header, 2.54Mm, Pin, Tht, Vertical, 6Way;", Color=Black, Contact Resistance=20mΩ, Current Rating=3A, Insulation Resistance=1GΩ, Manufacturer="Wurth Elektronik", Manufacturer Lifecycle Status=ACTIVE, Max Operating Temperature=105°C, Min Operating Temperature=-40°C, Operating Supply Voltage=250V, Package=None, Availability=Unavailable, Category="Headers and Wire Housings", ComponentLink1Description=https://datasheet.octopart.com:443/61300621121-W%C3%BCrth-Elektronik-datasheet-149524079.pdf?src-supplier=Wurth+Elektronik, ComponentLink1URL=https://datasheet.octopart.com:443/61300621121-W%C3%BCrth-Elektronik-datasheet-149524079.pdf?src-supplier=Wurth+Elektronik, ComponentLink2Description=https://datasheet.octopart.com:443/61300621121-W%C3%BCrth-Elektronik-datasheet-45185731.pdf?src-supplier=HQonline, ComponentLink2URL=https://datasheet.octopart.com:443/61300621121-W%C3%BCrth-Elektronik-datasheet-45185731.pdf?src-supplier=HQonline, ComponentLink3Description=https://datasheet.octopart.com:443/61300621121-W%C3%BCrth-Elektronik-datasheet-10693404.pdf?src-supplier=Newark, ComponentLink3URL=https://datasheet.octopart.com:443/61300621121-W%C3%BCrth-Elektronik-datasheet-10693404.pdf?src-supplier=Newark, Connector Type="Male Pin", Contact Material=Gold, Contact Mating Length=5.9944mm, Contact Plating=Gold, Gender=Male, Height=8.89mm, Lead Pitch=2.54mm, Length=7.62mm, Lifecycle Status=Production, Manufacturer Part Number=61300621121, MF="{'manufacturer': u'Wurth Elektronik'}", Mounting Technology="Through Hole", MP=61300621121, Number of Contacts=6, Number of Positions=6, Number of Rows=2, Orientation=Vertical, Packaging=Bulk, Pins=6, Pitch=2.54mm, Price=None, Pricing="1=0,641, 10=0,56, 25=0,533, 50=0,498, 100=0,478, 500=0,45, 1000=0,418, 5000=0,385 (USD)", RoHS=Compliant, Row Spacing=2.54mm, Stock=16511, Supplier=Newark, Supplier Part Number=61300621121, Termination=Solder, Voltage Rating=250V, YEOL="1 = Estimated lifetime > 10 years"
J4 J5: library part "kk396 2 circuits 26-60-4020", "CONN HEADER VERT 2POS 3.96MM", Color=Natural, Contact Resistance=6mR, Current Rating=7A, Flammability Rating="UL94 V-0", Max Operating Temperature=75°C, Max Voltage Rating (AC)=250V, Min Operating Temperature=0°C, Package Quantity=1400, Approvals=UL, Contact Gender=Male, Contact Material=Brass, Contact Mating Length=0.45inch, Contact Plating=Tin, Contact Type="Male Pin", Depth=10.01mm, Fastening Type=Friction, Gender=Male, Glow Wire Compliant=Non-compliant, Height=14.73mm, Housing Color=Natural, Housing Material=Polyester, Lead Free="Lead Free", Length=7.77mm, Material=Polyester, Max Current Rating=7A, Mount="Through Hole", Number of Circuits=2, Number of Contacts=2, Number of Lines=1, Number of Poles=2, Number of Positions=2, Number of Rows=1, Orientation=Straight, Packaging=Bulk, Pitch=3.96mm, Radiation Hardening=No, RoHS Compliant=Yes, Series="KK® 41791", Termination=Solder, Voltage Rating=250V
J6 J7: library part "CON 1X4P F THT", "4 Position Header Connector 0.100 (2.54mm) Through Hole Tin", Package=None, Check_prices=https://www.snapeda.com/parts/PPTC041LFBN-RC/Sullins/view-part/?ref=eda, MF="Sullins Connector", MP=PPTC041LFBN-RC, SnapEDA_Link=https://www.snapeda.com/parts/PPTC041LFBN-RC/Sullins/view-part/?ref=snap
L1: "FIXED IND 2.2UH 3.25A 0.061OHM", Package="Nonstandard WÃ¼rth Elektronik", Check_prices=https://www.snapeda.com/parts/74437324022/W%25C3%25BCrth+Elektronik+Midcom/view-part/?ref=eda, MF="WÃ¼rth Elektronik", MP=74437324022, SnapEDA_Link=https://www.snapeda.com/parts/74437324022/W%25C3%25BCrth+Elektronik+Midcom/view-part/?ref=snap
PCB1: library part "BOARD INFO", "Not Assembled PCB Component", Board Revision="Rev A", Project Name=ESP32-Titans-Dev_Kit
PS1: "3V-17V 1A Step-Down Converters with DCS-Controlâ„¢", Package="WSON-8 Texas Instruments", Check_prices=https://www.snapeda.com/parts/TPS62162DSGR/Texas+Instruments/view-part/?ref=eda, MF="Texas Instruments", MP=TPS62162DSGR, SnapEDA_Link=https://www.snapeda.com/parts/TPS62162DSGR/Texas+Instruments/view-part/?ref=snap